# Altium PCB PCB1.PcbDoc
Units mil, origin at the board's own origin, x right, y up, seen from the top; angles counter-clockwise.
Board outline 1456.69 x 1456.69 mil, 2 copper layers (Top Layer, Bottom Layer); 20 components, 8 nets, 51 pads, 15 vias.
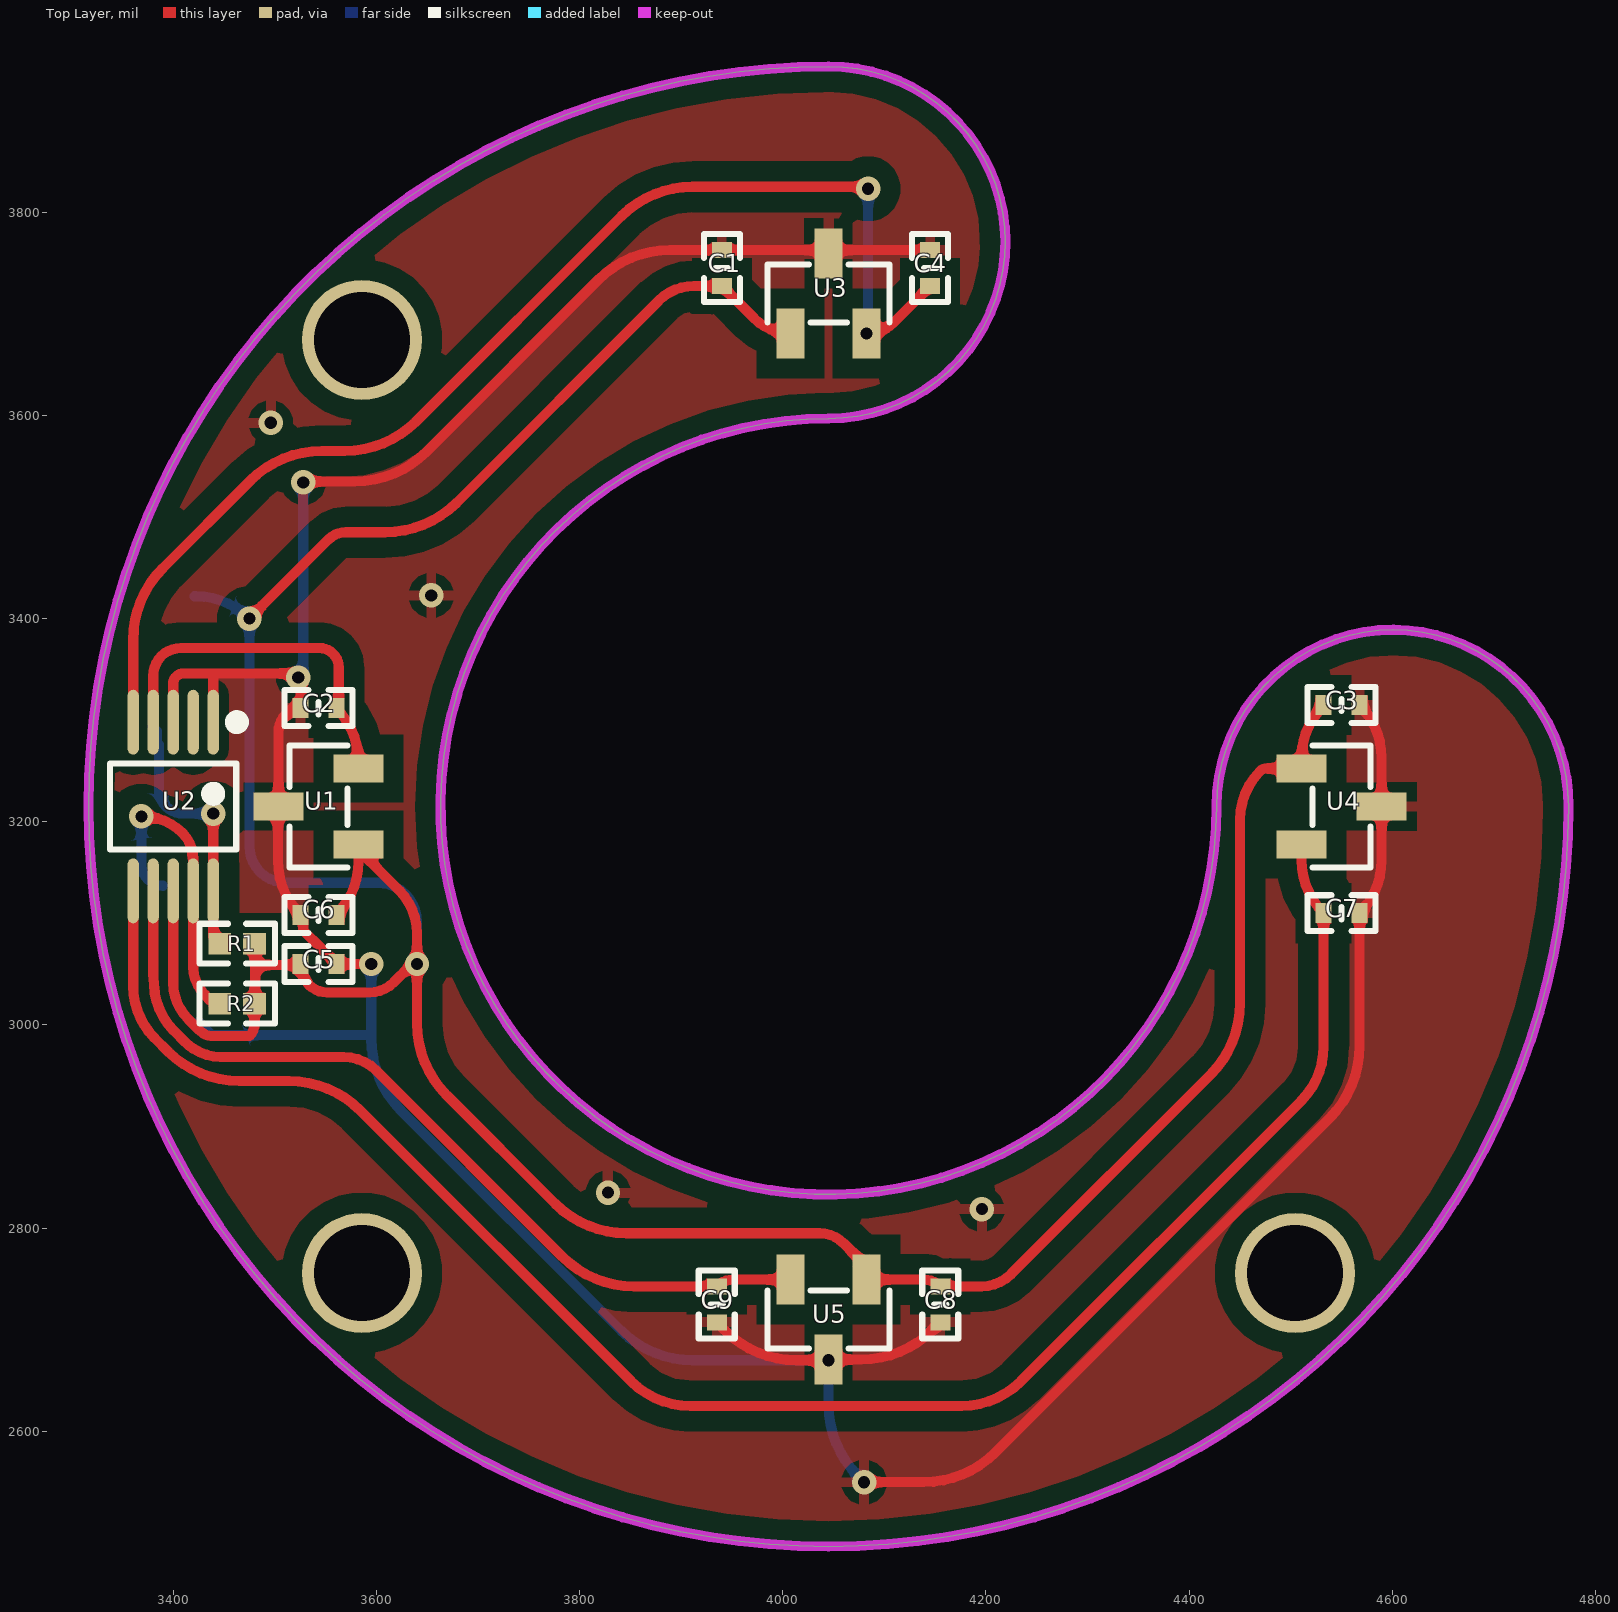
[diagram p0: Top Layer view]
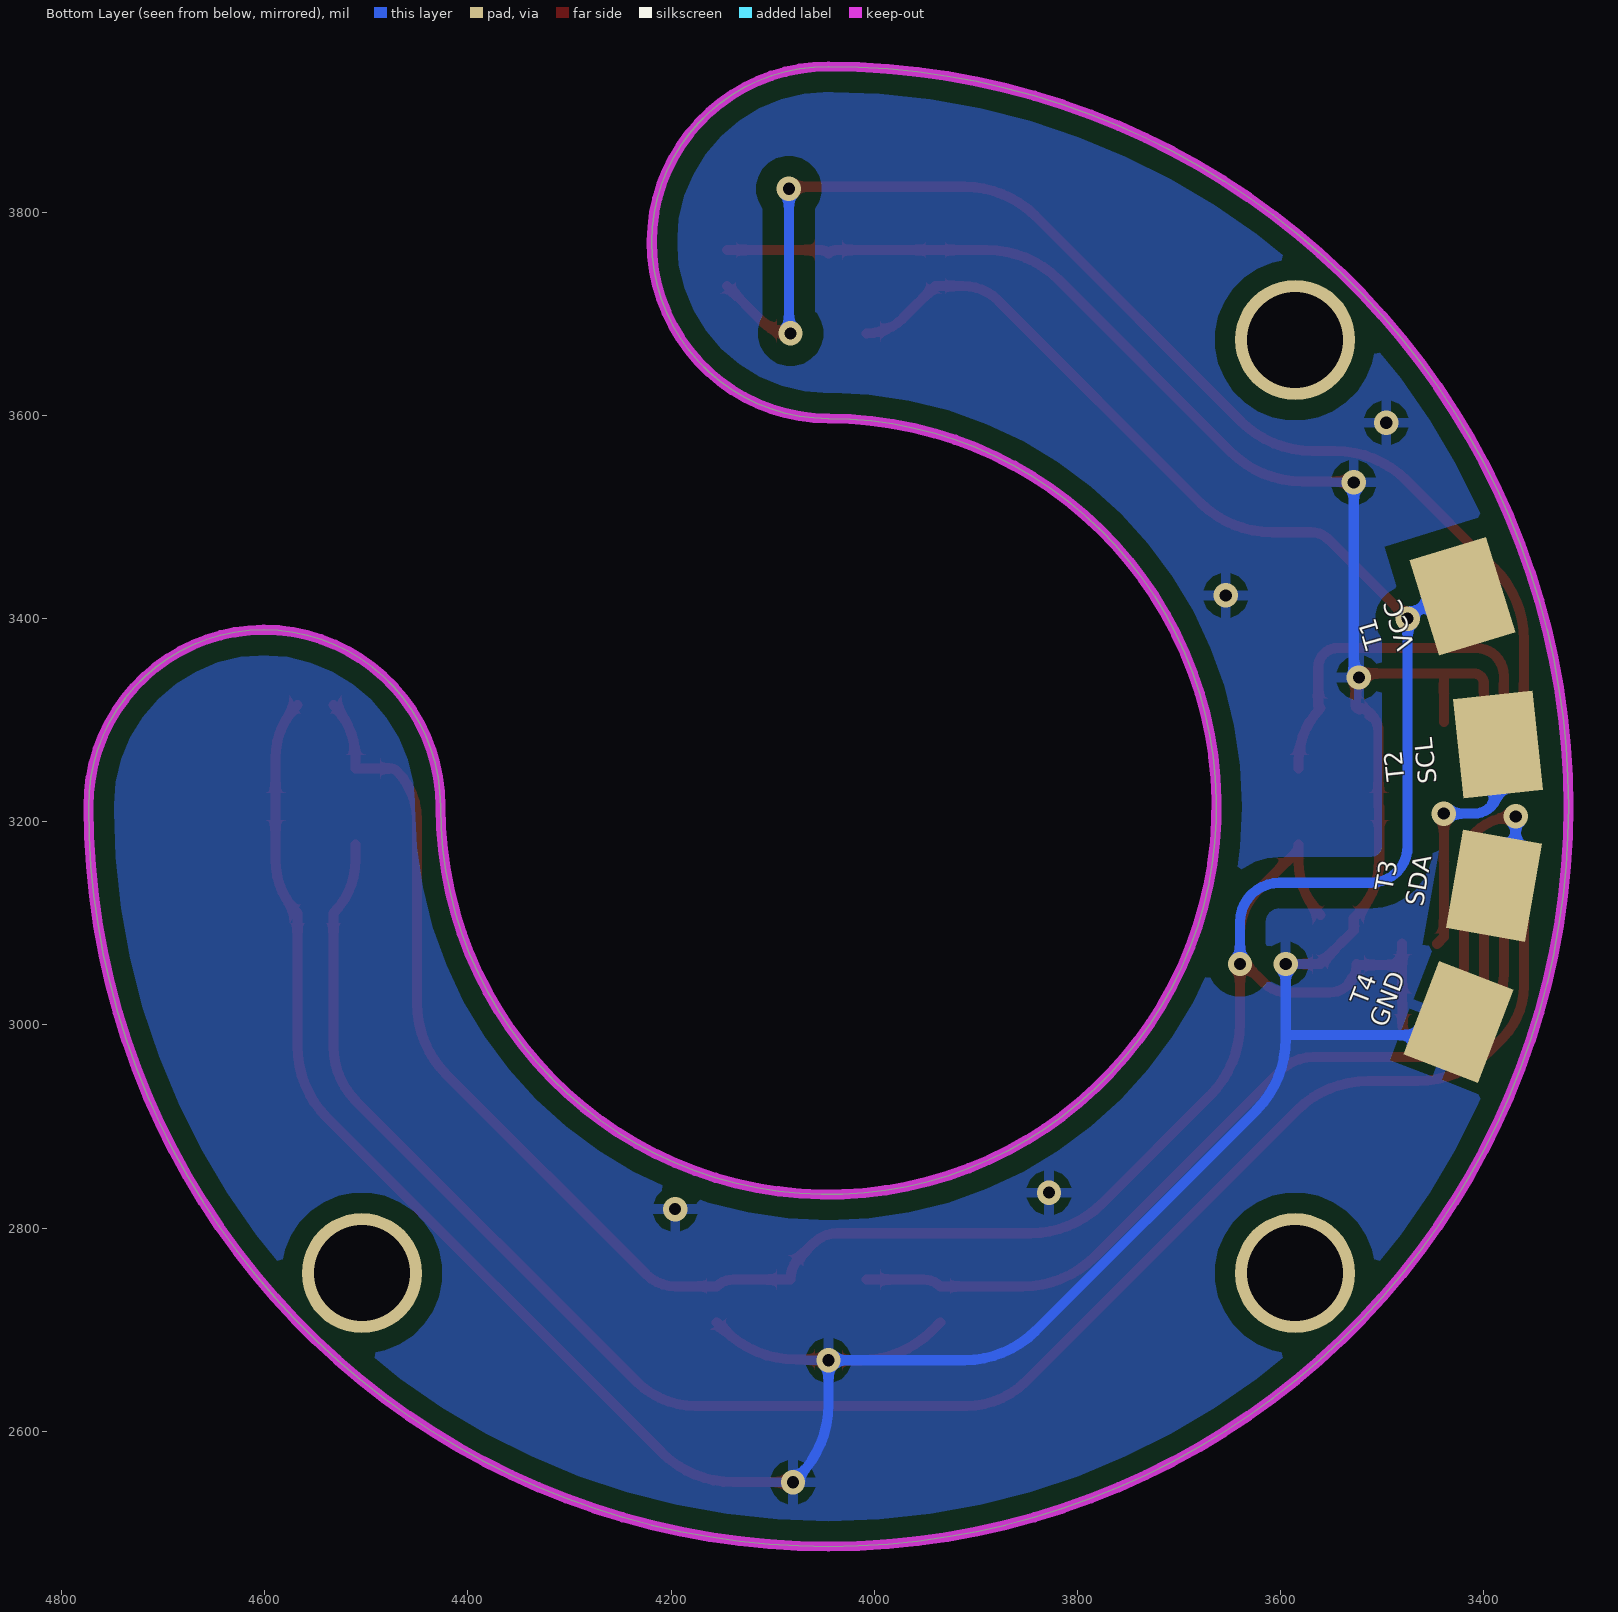
[diagram p1: Bottom Layer view, seen from below]

## Layer stack, top to bottom
Top Solder: solder mask 0.4, Solder Resist, Dk 3.5
Top Layer: signal copper 1.4
Dielectric 1: dielectric 12.6, FR-4, Dk 4.8
Bottom Layer: signal copper 1.4
Bottom Solder: solder mask 0.4, Solder Resist, Dk 3.5

## Board outline
4045,3943.35 ccw(c4045,3215) 4773.35,3215 ccw(c4600.12,3215.82) 4600.94,3389.05 ccw(c4600.94,3215) 4426.89,3215 cw(c4045,3215) 4045,3596.89 ccw(c4045,3770.94) 4219.05,3770.94 ccw(c4045.83,3770.12)
cut-out: 0,0 10,0 10,10 0,10

## Design rules (kind name [scope] priority, off if disabled: settings)
Clearance Clearance_Inpoly [(InPoly)] p1: gap=20 ignorepadtopadclearanceinfootprint=TRUE
Clearance [All] p2: gap=8 ignorepadtopadclearanceinfootprint=TRUE
HoleSize [All] p1 off: absolutevalues=TRUE maxlimit=100 minlimit=1 maxpercent=80.000 minpercent=20.000
MinimumSolderMaskSliver [All] p1 off: minsoldermaskwidth=10
PolygonConnect [All] p1: connectstyle=Relief reliefconductorwidth=10 reliefentries=4 polygonreliefangle="90 Angle" airgapwidth=10
RoutingCorners [All] p1: cornerstyle=Round minsetback=100 maxsetback=100
RoutingCorners RoutingCorners_1 [All] p2: cornerstyle=Round minsetback=100 maxsetback=100
RoutingVias [All] p1: holewidth=28 width=50 viastyle="Through Hole" minholewidth=28 minwidth=50 maxholewidth=28 maxwidth=50
SilkToSilkClearance [All] p1 off: silktosilkclearance=10
SilkToSolderMaskClearance [IsPad] p1 off: minsilkscreentomaskgap=10 clearancetoexposedcopper=TRUE
SolderMaskExpansion [All] p1: expansion=4 istentingtop=FALSE
Width [All] p1: maxlimit=10 minlimit=10 preferedwidth=10
25 further rules are at their usual default settings.

## Classes and differential pairs
component class Sheet1: C1 C2 C3 C4 C5 C6 C7 C8 C9 R2 T1 T3 U1 U2 U3 U4 U5

## Components (designator, comment, footprint, x,y, rotation, side; value= is the part's Value field where it differs from the comment)
C1 "0402/104" 0402C 3940,3745 r270 top locked value=104
C2 "0402/4.7nF" 0402C 3542.91,3311.86 r0 top locked value=104
C3 "0402/104" 0402C 4550,3315 r180 top value=104
C4 "0402/4.7nF" 0402C 4145,3745 r270 top locked value=104
C5 "0402/104" 0402C 3542.91,3060 r180 top value=104
C6 "0402/104" 0402C 3542.91,3108.19 r0 top locked value=104
C7 "0402/4.7nF" 0402C 4550,3110 r180 top locked value=104
C8 "0402/104" 0402C 4155,2725 r90 top locked value=104
C9 "0402/4.7nF" 0402C 3935,2725 r90 top locked value=104
R1 "10kΩ" R0402 3463,3080 r0 top
R2 "10kΩ" R0402 3463,3021 r0 top
T1 "VCC" BLDC_P#1 3421,3422 r180 bottom
T2 "GND" BLDC_P#2 3386,3276 r210 bottom (schematic designator T4)
T3 "SDA" BLDC_P#3 3390,3137 r180 bottom
T4 "GND" BLDC_P#4 3425,3003 r315 bottom
U1 "MT9105ET" SOT-23-3_L2.9 3543,3215 r0 top locked
U2 "ADS1115IDGSR" MSOP-10 3400,3215 r180 top locked
U3 "MT9105ET" SOT-23-3_L2.9 4045,3720 r270 top locked
U4 "MT9105ET" SOT-23-3_L2.9 4550,3215 r180 top locked
U5 "MT9105ET" SOT-23-3_L2.9 4045,2710 r90 top locked

## Footprints (in the part's own frame and the unit in brackets; to place one, negate y for a bottom-side part, rotate by r counter-clockwise, add the part's x,y. Pads: shape width x height; smd on the part's side, far side on the other; paste and mask are expansions set on the pad)
0402C [mm] "无极性贴片电容"
  rect 0.4x0.5 smd: 1(-0.45,0) 2(0.45,0)
  silkscreen extent -0.85,-0.45 0.85,0.45, body extent -0.5,-0.26 0.5,0.26, height 0.53
BLDC_P#1 [mm]
  rect 2.5x2 smd rot 107: 1(0,0)
BLDC_P#2 [mm]
  rect 2.5x2 smd rot 126: 1(0,0)
BLDC_P#3 [mm]
  rect 2.5x2 smd rot 80: 1(0,0)
BLDC_P#4 [mm]
  rect 2.5x2 smd rot 24: 1(0,0)
MSOP-10 [mm]
  oval 0.28x1.62 smd: 1(-1,-2.11) 2(-0.5,-2.11) 3(0,-2.11) 4(0.5,-2.11) 5(1,-2.11) 6(1,2.11) 7(0.5,2.11) 8(0,2.11) 9(-0.5,2.11) 10(-1,2.11)
  silkscreen extent -1.74,-2.26 1.58,1.07, body extent -1.5,-2.5 1.5,2.5, height 1.1
R0402 [mm]
  rect 0.566x0.54 smd paste-100 mask+0.051: 1(-0.433,0) 2(0.433,0)
  silkscreen extent -0.94,-0.5 0.94,0.5
SOT-23-3_L2.9 [mm]
  rect 1.25x0.7 smd: 1(1,-0.95) 2(1,0.95) 3(-1,0)
  silkscreen extent -0.73,-1.53 0.73,1.53, body extent -1.25,-1.45 1.25,1.45, height 1.05

## Part data
C1 C2 C3 C4 C5 C6 C7 C8 C9: library part C, "贴片电容", 嘉立创元件编号=C110251
R1 R2: library part 0402WGF1002TCE, JLCPCB Part Class="Basic Part", LCSC Part Name="10kΩ ±1% 62.5mW 厚膜电阻", Manufacturer=UNI-ROYAL(厚声), Operating Temperature=-55℃~+155℃, Power(Watts)=62.5mW, Temperature Coefficient=±100ppm/℃, Tolerance=±1%, Voltage-Supply(Max)=50V, Add into BOM=yes, Convert to PCB=yes, Datasheet=https://item.szlcsc.com/datasheet/0402WGF1002TCE/26487.html, Device=0402WGF1002TCE, Manufacturer Part=0402WGF1002TCE, Supplier=LCSC, Supplier Footprint=0402, Supplier Part=C25744, Symbol=0402WGF1002TCE, Type=厚膜电阻
T1 T2 T3 T4: library part "Test Point", "测试点"
U1 U3 U4 U5: "线性磁感应霍尔"
U2: "ADC采样芯片，IIC通信", JLCPCB Part Class="Extended Part", LCSC Part Name="具有内部基准、振荡器和可编程比较器且兼容 I2C 的ADS111x、超小型、低功耗 860SPS、16位ADC", Manufacturer=TI(德州仪器), Operating Temperature=-40℃~+125℃, Voltage - Supply=2V~5.5V, Add into BOM=yes, Convert to PCB=yes, Datasheet=https://www.ti.com/cn/lit/gpn/ads1115, Device=ADS1115IDGSR, differential input=-, Integral non - linearity=1LSB, Interface=I2C, Manufacturer Part=ADS1115IDGSR, number of channels=4, Resolution(Bits)=16位, Sampling Rate=-, Supplier=LCSC, Supplier Footprint=VSSOP-10, Supplier Part=C37593, Symbol=ADS1115IDGSR

## Free pads (board coordinates)
  round 118.11 hole 94.49: 1(3585.66,2755.66) 1(3585.66,3674.34) 1(4504.34,2755.66)

## Via types
v1: diameter 24, hole 12, Top Layer to Bottom Layer, tented both sides, 14 vias
v2: diameter 24/24 (per signal layer), hole 12, Top Layer to Bottom Layer, tented both sides, 1 vias

## Nets (pads, with @x,y where several pads share a name; then routed paths per layer and width w, separated by ;. In a path a pad name is that pad's centre, name@x,y a point inside that pad or via, vN(x,y) a via of type N, cw(c..) or ccw(c..) an arc to the next point about the centre after c; other vN are vias at no path point)
GND: C1.1 C2.1 C3.1 C4.1 C5.1 C6.1 C7.1 C8.1 C9.1 T4.1 U1.3 U2.1 U2.3 U3.3 U4.3 U5.3 | length 3716.8
  Top Layer w10: U2.3 3400,3336 cw(c3410,3336) 3410,3346 3439,3346 ; U2.1 3439.37,3345.63 3439,3346 ; C2.1@3522.18,3310.61 C2.1 ccw(c3523.25,3313.8) 3526,3313.8 3526,3332.34 ccw(c3512.34,3332.34) 3512.34,3346 3439,3346 ; C2.1@3524.53,3313.02 ccw(c3528.92,3288.11) 3503.63,3288.11 3503.63,3287.43 U1.3 3503,3214.37 3503,3161.77 ccw(c3578.78,3161.77) C6.1 3528.07,3105.32 3528.07,3092.93 3538.15,3082.85 3538.46,3082.85 3546.07,3075.23 3546.07,3074.93 3556.16,3064.84 3557.75,3064.84 3560.63,3061.97 C5.1 3582.93,3060 ccw(c3582.93,3077.07) v1@3595,3065 ; v1(3528,3534) 3529,3535 3578.58,3535 ccw(c3578.58,3635) 3649.29,3564.29 3818.43,3733.43 cw(c3889.14,3662.72) 3889.14,3762.72 C1.1 4036.92,3762.72 cw(c4036.92,3751.29) U3.3 cw(c4053.08,3751.29) 4053.08,3762.72 C4.1 ; C9.1 3942.99,2699.29 ccw(c4013.7,2770) 4013.7,2670 v1(4045,2670) ; U5.3 4076.93,2670.63 ccw(c4076.93,2770.63) 4147.64,2699.92 C8.1 ; v1(4080,2550) 4138.58,2550 ccw(c4138.58,2650) 4209.29,2579.29 4538.43,2908.43 ccw(c4467.72,2979.14) 4567.72,2979.14 C7.1 ccw(c4515.44,3162.28) 4589.37,3162.28 U4.3 4589.37,3262.72 ccw(c4515.44,3262.72) C3.1
  Bottom Layer w10: T4.1 3438,2990 3595,2990 ; v1(3523,3342) ccw(c3523,3347) 3528,3347 v1(3528,3534) ; v1(3595,3060) 3595,2986.42 ccw(c3695,2986.42) 3624.29,2915.71 3840.71,2699.29 ccw(c3911.42,2770) 3911.42,2670 v1(4045,2670) 4045,2626.42 ccw(c4145,2626.42) 4074.29,2555.71 v1(4080,2550)
  other v1: 4196,2818.77 3828,2835 3654,3422.77 3496,3592.77
H1N: C4.2 U2.5 U3.2 | length 1220.5
  Top Layer w10: U2.5 3360.63,3379.12 cw(c3460.63,3379.12) 3389.92,3449.83 3475.8,3535.71 cw(c3546.51,3465) 3546.51,3565 3568.58,3565 ccw(c3568.58,3665) 3639.29,3594.29 3840.71,3795.71 cw(c3911.42,3725) 3911.42,3825 4082,3825 v2(4084,3823) ; v1(4082.4,3680.63) ccw(c4082.4,3719.11) 4109.61,3691.9 C4.2
  Bottom Layer w10: v1(4082.4,3680.63) ccw(c4082.4,3682.23) 4084,3682.23 v2(4084,3823)
H1P: C2.2 U1.2 U2.4 | length 361.1
  Top Layer w10: U2.4 3380.31,3343.68 cw(c3407.64,3343.68) 3407.64,3371 3543.92,3371 cw(c3543.92,3351.92) 3563,3351.92 3563,3314.23 C2.2 cw(c3508.12,3259.35) 3582.37,3259.35 U1.2
H2N: C9.2 U2.7 U5.2 | length 849.2
  Top Layer w10: U2.7 3380.31,3049.67 ccw(c3443.11,3049.67) 3381.02,3040.23 ; 3381,3042 ccw(c3448.6,3042) 3381.02,3040.23 ; 3419.67,2976.74 cw(c3465.28,3044.88) 3418.6,2977.47 cw(c3446.77,3017.77) 3412,2983 3400.8,2994.2 cw(c3448.6,3042) 3381.02,3040.23 ; 3419.68,2976.73 ccw(c3446.77,3017.77) 3446.77,2968.6 3474.06,2968.6 ccw(c3475.43,2978.5) 3475.43,2968.5 3567.62,2968.5 cw(c3567.62,2922.94) 3599.84,2955.16 3783,2772 ccw(c3853.71,2842.71) 3853.71,2742.71 C9.2 cw(c3951.07,2726.64) 3951.07,2749.37 U5.2
H2P: C7.2 U2.6 U4.2 | length 1801.6
  Top Layer w10: U2.6 3360.63,3038.35 ccw(c3433.63,3038.35) 3382.01,2986.73 3394.57,2974.17 ccw(c3465.28,3044.88) 3465.28,2944.88 3513.7,2944.88 cw(c3513.7,2844.88) 3584.41,2915.59 3850.71,2649.29 ccw(c3909.35,2707.93) 3909.35,2625 4175.65,2625 ccw(c4175.65,2707.93) 4234.29,2649.29 4510.07,2925.07 ccw(c4456.43,2978.71) 4532.29,2978.71 C7.2 cw(c4584.57,3162.29) 4510.63,3162.29 U4.2
SCL: R1.1 T2.1 U2.10 | length 264
  Top Layer w10: v1(3439.37,3208) U2.10 3439.37,3086.59 R1.1
  Bottom Layer w10: T2.1@3379.63,3293.53 3384,3289.15 3384,3276 3385,3275 T2.1@3386,3274 ; T2.1 T2.1@3386,3274 ; v1(3439.37,3208) 3409.9,3208 cw(c3409.9,3231.9) 3393,3215 cw(c3409.9,3231.9) 3386,3231.9 T2.1@3386,3274
SDA: R2.1 T3.1 U2.9 | length 311.9
  Top Layer w10: v1@3371.36,3202.64 v1(3368.68,3205.32) 3369.6,3205.32 cw(c3369.6,3149.6) 3409,3189 cw(c3383.22,3163.22) 3419.68,3163.22 U2.9 3419.68,3057.33 ccw(c3458.33,3057.33) 3431,3030 3435.79,3025.21 ccw(c3445.96,3035.39) R2.1
  Bottom Layer w10: v1(3368.68,3205.32) 3368.68,3158.32 ccw(c3390,3158.32) T3.1
VCC3V3: C1.2 C3.2 C5.2 C6.2 C8.2 R1.2 R2.2 T1.1 U1.1 U2.8 U3.1 U4.1 U5.1 | length 3370.7
  Top Layer w10: U2.8 3400,3041.28 ccw(c3450.28,3041.28) 3414.73,3005.73 3424.69,2995.77 ccw(c3446.77,3017.77) 3428.79,2992.3 ccw(c3465.28,3044.88) 3429.56,2991.78 ccw(c3446.77,3017.77) 3431.41,2990.65 ccw(c3436.28,2999.38) 3434.21,2989.6 ccw(c3440.07,3018.14) 3440.07,2989 3475,2989 ccw(c3462.83,3001.17) 3480.04,3001.17 R2.2 ; v1(3475,3400) 3552.93,3477.93 cw(c3570,3460.86) 3570,3485 3608.58,3485 ccw(c3608.58,3585) 3679.29,3514.29 3877.93,3712.93 cw(c3912.59,3678.27) 3912.59,3727.29 C1.2 3971.84,3695.44 ccw(c4007.6,3731.2) U3.1 ; R2.2@3480.44,3021.6 3480.44,3059 ; R1.2@3480.44,3080 3480.44,3059 ; C6.2 ccw(c3508.12,3160.69) 3582.37,3160.69 U1.1 ccw(c3594.37,3177.6) 3585.88,3169.12 3622.32,3132.68 cw(c3579.64,3090) 3640,3090 v1(3640,3060) ; C3.2 ccw(c4584.57,3262.72) 4510.63,3262.72 U4.1 4475.79,3252.4 ccw(c4475.79,3244.21) 4470,3250 ccw(c4518.28,3201.72) 4450,3201.72 4450,3021.42 cw(c4350,3021.42) 4420.71,2950.71 4225,2755 cw(c4195.34,2784.66) 4195.34,2742.71 C8.2 ccw(c4138.93,2726.64) 4138.93,2749.37 U5.1 ccw(c4050.46,2749.37) 4073.04,2771.95 4060,2785 ccw(c4035.86,2760.86) 4035.86,2795 3846.42,2795 cw(c3846.42,2895) 3775.71,2824.29 3669.29,2930.71 cw(c3740,3001.42) 3640,3001.42 v1(3640,3060) ; 3480.44,3059 3522.78,3059 ccw(c3522.78,3062.43) C5.2 ccw(c3554.37,3060) 3525.91,3053.59 ccw(c3554.37,3060) 3533.74,3039.37 ccw(c3551.54,3057.18) 3551.54,3032 3593,3032 ccw(c3593,3066.19) 3617.17,3042.01 3631.74,3056.58 cw(c3640,3048.32) v1(3640,3060)
  Bottom Layer w10: T1.1 3421.89,3422 cw(c3421.89,3346.89) v1(3475,3400) 3475,3176 ccw(c3511,3176) 3511,3140 3601,3140 cw(c3601,3101) 3640,3101 v1(3640,3060)
pads on no net: U2.2

## Polygon pours and split planes (outlines as drawn)
GND on Bottom Layer "GND_L02_P003" (solid, remove dead copper, pour order 3): 4045,3943.35 ccw(c4045,3215) 4773.35,3215 ccw(c4600.12,3215.82) 4600.94,3389.05 ccw(c4600.94,3215) 4426.89,3215 cw(c4045,3215) 4045,3596.89 ccw(c4045,3770.94) 4219.05,3770.94 ccw(c4045.83,3770.12)
GND on Top Layer "GND_L01_P002" (solid, remove dead copper, pour order 2): 4045,3943.35 ccw(c4045,3215) 4773.35,3215 ccw(c4600.12,3215.82) 4600.94,3389.05 ccw(c4600.94,3215) 4426.89,3215 cw(c4045,3215) 4045,3596.89 ccw(c4045,3770.94) 4219.05,3770.94 ccw(c4045.83,3770.12)

## Keep-outs
Keep-Out Layer:
  the board outline again, w10

## Silkscreen, mask and mechanical layers (free items; w line width, h text height)
Bottom Overlay:
  text "VCC" at 3462.33,3373.93 h30 r253
  text "SCL" at 3440.33,3238.97 h30 r264
  text "SDA" at 3454.33,3115.06 h30 r280
  text "GND" at 3491.31,2994.12 h30 r291